# Altium PCB John_Main.PcbDoc (part 4 of 5)
Units mil, origin at the board's own origin, x right, y up, seen from the top; angles counter-clockwise.
Board outline 3346 x 2756 mil, 2 copper layers (Top Layer, Bottom Layer), stack 57 mil thick; 275 components, 161 nets, 721 pads, 398 vias.
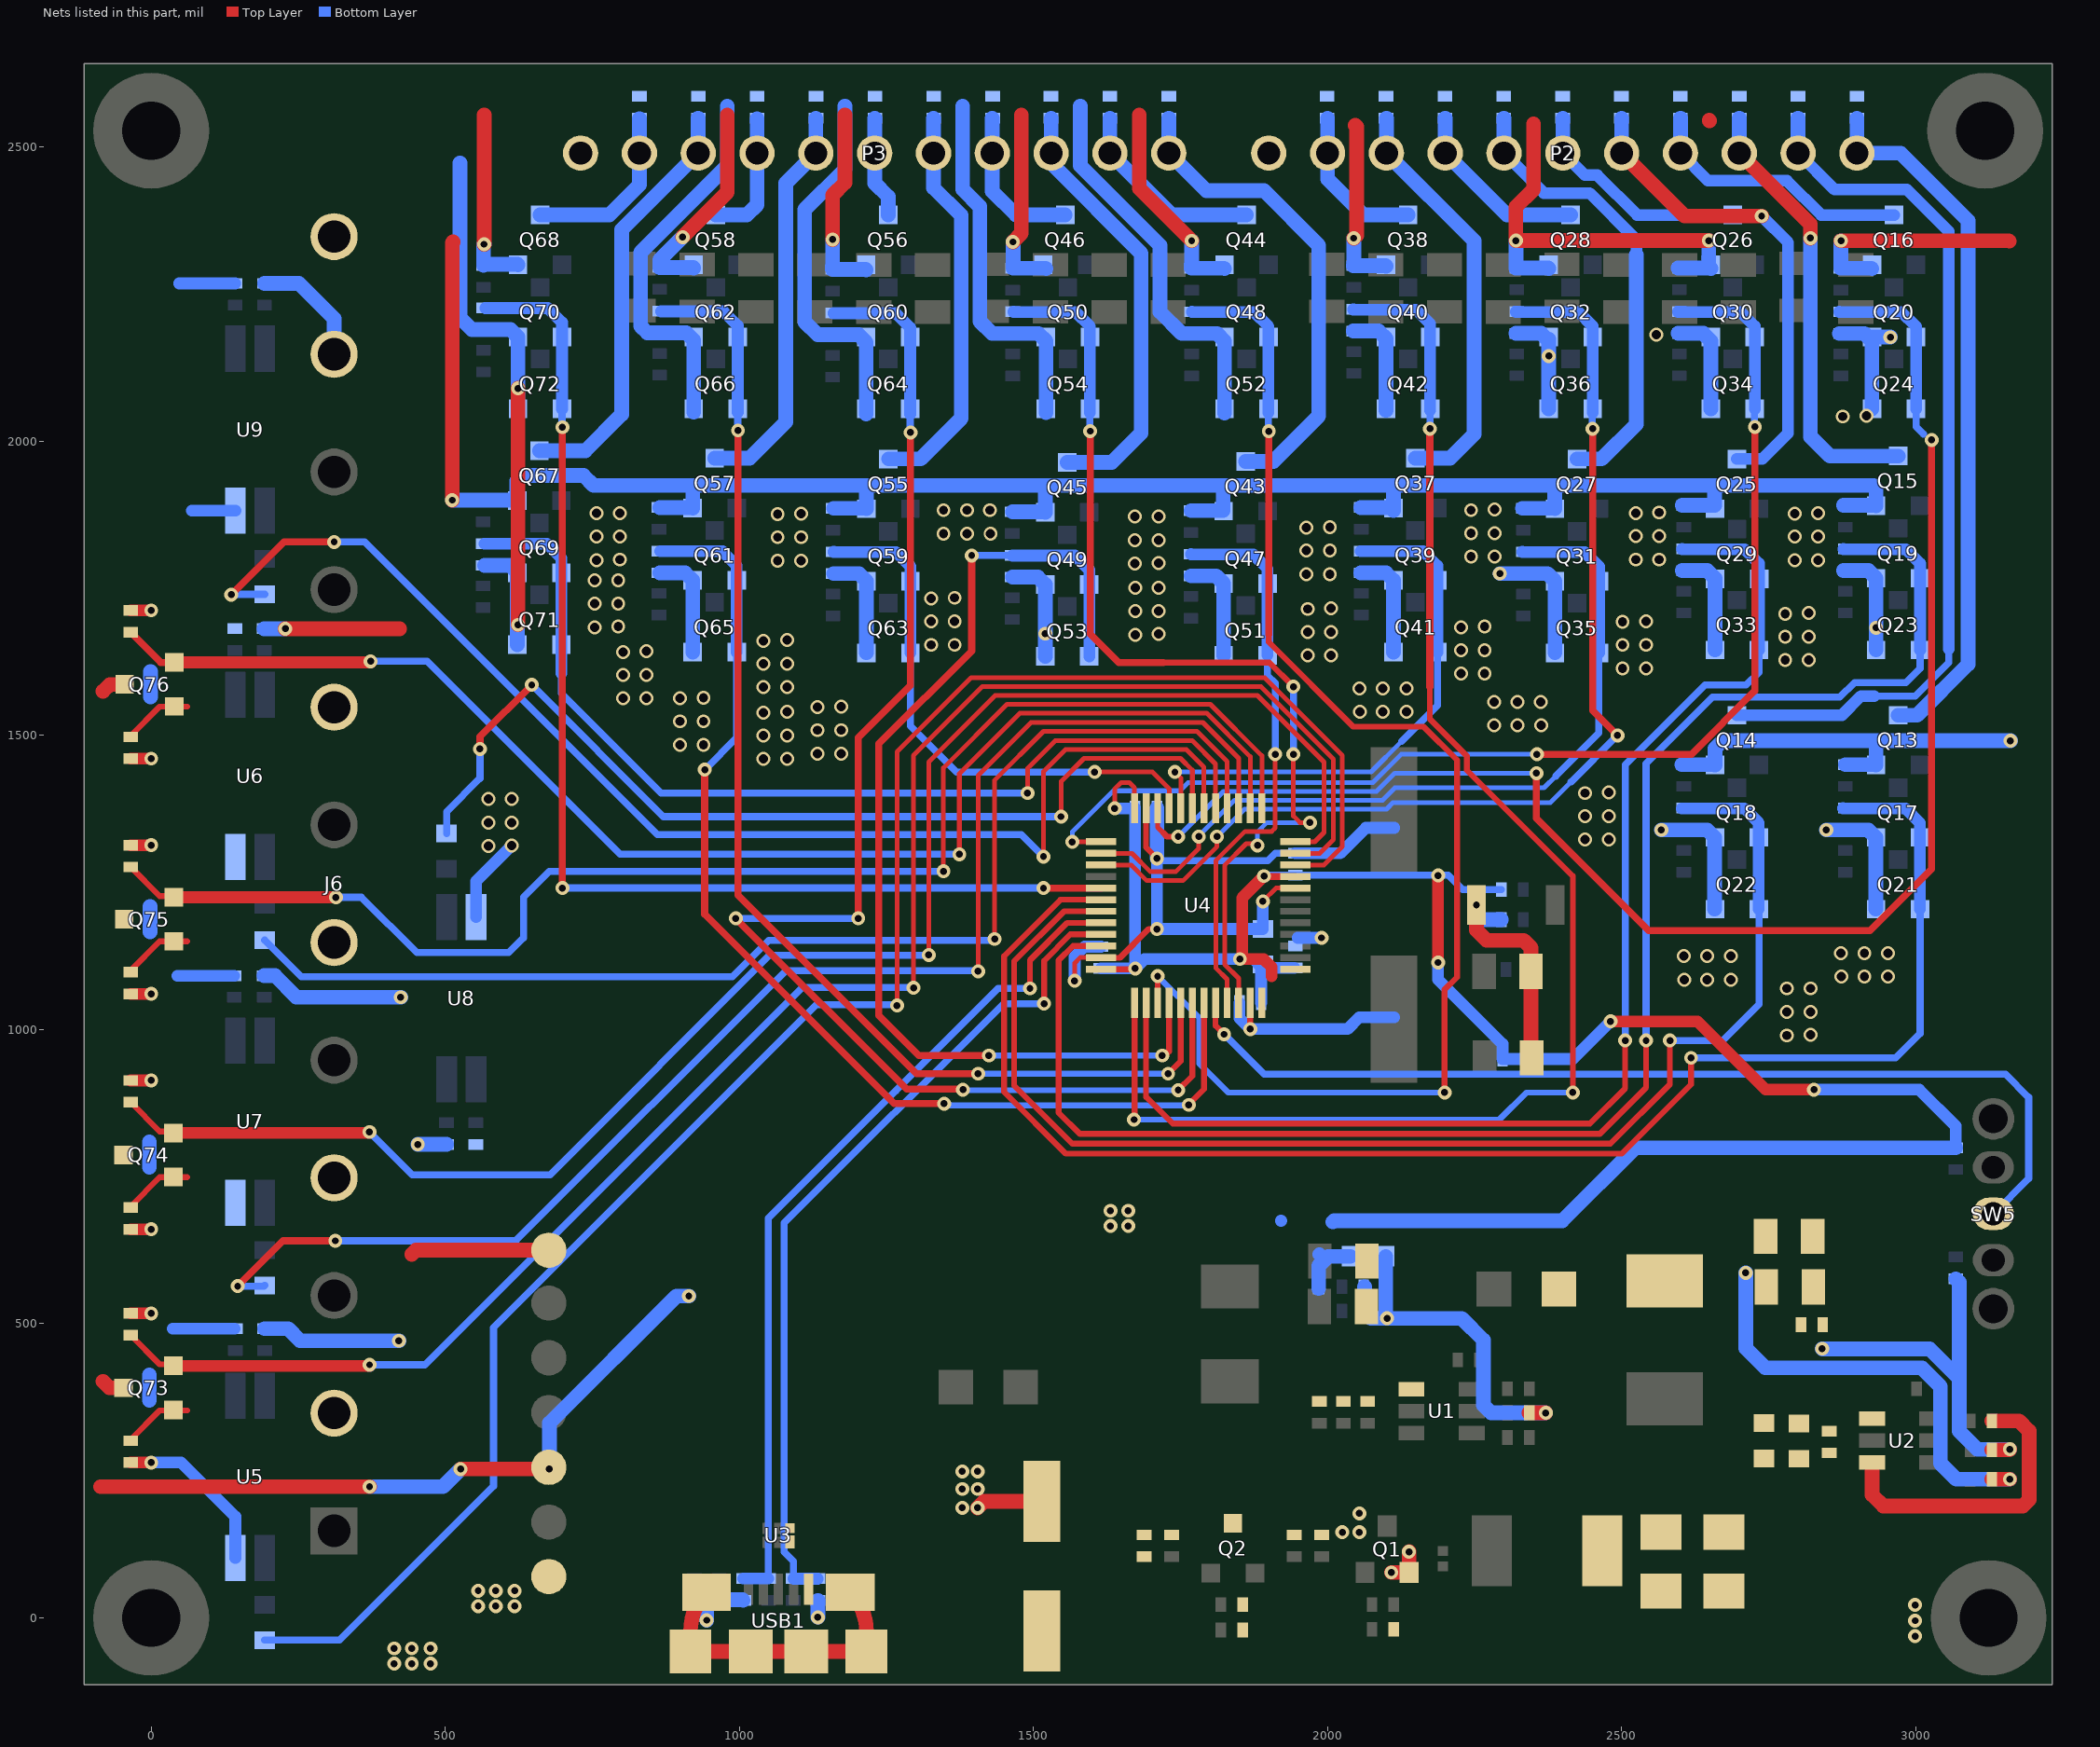
[diagram p2: the nets of this part, all layers, seen from the top]

## Via types
v1: diameter 23.62, hole 11.81, Top Layer to Bottom Layer, tented both sides, 233 vias
v2: diameter 23.62, hole 15.75, Top Layer to Bottom Layer, tented both sides, 165 vias

## Nets (pads, with @x,y where several pads share a name; then routed paths per layer and width w, separated by ;. In a path a pad name is that pad's centre, name@x,y a point inside that pad or via, vN(x,y) a via of type N, cw(c..) or ccw(c..) an arc to the next point about the centre after c; other vN are vias at no path point) (continued)
LED_GPIO_41: (continued)
  Top Layer w12: v1(994,1189) 1284.19,898.81 1379.19,898.81 v1(1380,898) ; v1(1202,1189) 1202,1496 1290.91,1584.91 v1(1290.91,2015.18)
  Bottom Layer w10: v1(1380,898) 1381,897 v1(1746,897)
  Bottom Layer w12: v1(994,1189) v1(1202,1189) ; v1@1290.4,2015.68 Q64.1@1290.4,2046.35
  Bottom Layer w20: R107.1@1159.99,2218.18 1159.99,2217.68 1265.99,2217.68 1290.4,2193.27 Q60.1@1290.4,2177.18 Q64.1@1290.4,2055.18 Q64.1@1290.4,2046.35
LED_GPIO_42: Q61.1 Q65.1 R108.1 U4.43 | length 1889.3
  Top Layer w10: v1@1764,871 v1(1764,872) 1764,873 1789.84,898.84 U4.43@1789.84,1045.65
  Top Layer w12: v1@941,1433 941,1196 1263,874 v1(1348,874)
  Bottom Layer w10: v1@1348,872 1349,871 v1@1764,871
  Bottom Layer w12: v1(941,1442) 995.41,1496.41 Q65.1@995.41,1641.68
  Bottom Layer w20: R108.1@865,1813.5 865,1813 971,1813 995.41,1788.59 Q61.1@995.41,1763.68 Q65.1@995.41,1641.68
LED_GPIO_43: Q62.1 Q66.1 R109.1 U4.41 | length 2095.3
  Top Layer w10: v1(1729,925) 1750.47,946.47 U4.41@1750.47,1045.65
  Top Layer w12: v1(997.67,2018.5) 997.67,1228.33 1301,925 v1(1406,925)
  Bottom Layer w10: v1(1406,925) v1(1729,925)
  Bottom Layer w12: v1@997.16,2019 Q66.1@997.16,2049.67
  Bottom Layer w20: R109.1@866.76,2221.5 866.76,2221 972.76,2221 997.16,2196.59 Q62.1@997.16,2177.18 Q66.1@997.16,2055.18 Q66.1@997.16,2049.67
LED_GPIO_44: Q69.1 Q71.1 R116.1 U4.17 | length 1706
  Top Layer w8: v1(1490,1402) 1490,1444 1537,1491 1770,1491 1809.53,1451.47 U4.17@1809.53,1376.35
  Bottom Layer w12: 697.4,1606 697.4,1571.6 867,1402 v1(1490,1402)
  Bottom Layer w20: R116.1@566.99,1826.18 566.99,1825.68 672.99,1825.68 697.4,1801.27 Q69.1@697.4,1776.35 Q71.1@697.4,1654.35 697.4,1606
LED_GPIO_45: Q70.1 Q72.1 R117.1 U4.29 | length 2018.7
  Top Layer w12: v1(699,1240.53) v1(699,2024) ; v1(1517,1240.53) U4.29@1614.65,1240.53
  Bottom Layer w12: Q72.1@698.5,2055.18 698.5,2024.5 v1(699,2024) ; v1(699,1240.53) 699.28,1240.81 1516.72,1240.81 v1(1517,1240.53)
  Bottom Layer w20: R117.1@568.09,2227 568.09,2226.5 674.09,2226.5 698.5,2202.09 Q70.1@698.5,2177.18 Q72.1@698.5,2055.18
M_VDD: C25.2 CU1.1 CU2.1 CU3.1 CU4.1 CU5.1 CU6.1 CU7.1 FB1.2 J1.1 Q73.3 Q74.3 Q75.3 Q76.3 R3.2 RU1.2 RU2.2 U4.1 U4.9 U4.24 U4.36 U4.48 | length 5343.3
  Top Layer w8: v1(1638,1376) 1638,1409 1649,1420 1663,1420 1671.73,1411.27 U4.24@1671.73,1376.35
  Top Layer w10: U4.36@1614.65,1102.73 1671.73,1102.73 v1(1672.92,1103.92)
  Top Layer w12: v1(1892,1261) 1892.79,1260.21 U4.9@1945.35,1260.21
  Top Layer w20: v1(1892,1261) 1855,1224 1855,1124 v1(1851,1120) 1891,1120 1905,1106 1905,1090.9 ; v1(2188,1114) v1(2188,1262) ; v1(2481,1014) 2629,1014 2745,898 v1(2827,898)
  Top Layer w25: -86,223 v1(371.28,223) ; -82,402 -70.99,390.99 Q73.3@-46.82,390.99 ; -82,1575 -70.18,1586.82 Q76.3@-45.1,1586.82 ; v1(526,253) v1(677,253)
  Bottom Layer w12: 1837,1118.46 1869.62,1118.46 1886.08,1102 1887.08,1103 1887.08,1105 1887.08,1108.08 CU5.1@1890,1111 ; v1(1892,1261) 1893.58,1262.58 CU7.1@1945.35,1262.58 2205.42,1262.58 2230,1238 RU1.2@2295.5,1238 ; CU4.1@1943.25,1103 CU4.1@1945.35,1105.1
  Bottom Layer w20: CU2.1@1614.65,1103.92 v1(1672.92,1103.92) ; v1(1638,1376) 1672.56,1376 CU6.1@1672.92,1376.35 CU1.1@1672.92,1327 v1(1672.92,1103.92) ; v1(1851,1120) 1689,1120 v1(1672.92,1103.92) ; CU3.1@1887.08,1045.65 CU5.1@1887.08,1103 ; CU5.1@1887.08,1105 CU4.1@1943.25,1105 ; v1@1891.5,1261.5 v1(1892,1261) ; 1921,675 1921.1,675.1 ; 1984,618 1986,620 ; v1(2188,1114) 2188,1085 2297.5,975.5 R3.2@2297.5,950 2417,950 v1(2481,1014) ; v1(2827,898) 3006,898 3068,836 RU2.2@3068,799.21
  Bottom Layer w25: v1(371.28,223) 496,223 v1(526,253) ; v1(677,253) 677,331 893,547 v1(914,547) ; FB1.2@1984.94,560.1 1984.94,598.5 2000.94,614.5 C25.2@2038.94,614.5 ; 2009,673 2011,675 2399,675 2523.21,799.21 RU2.2@3068,799.21
  other v1: 1631,666 1661,666 1631,692 1661,692